# Altium PCB PCB1_AM.PcbDoc
Units mm, origin at the board's own origin, x right, y up, seen from the top; angles counter-clockwise.
Board outline 140 x 140 mm, 2 copper layers (Top Layer, Bottom Layer); 42 components, 25 nets, 98 pads, 0 vias.
Unrouted connection lines stored in the file: 3.
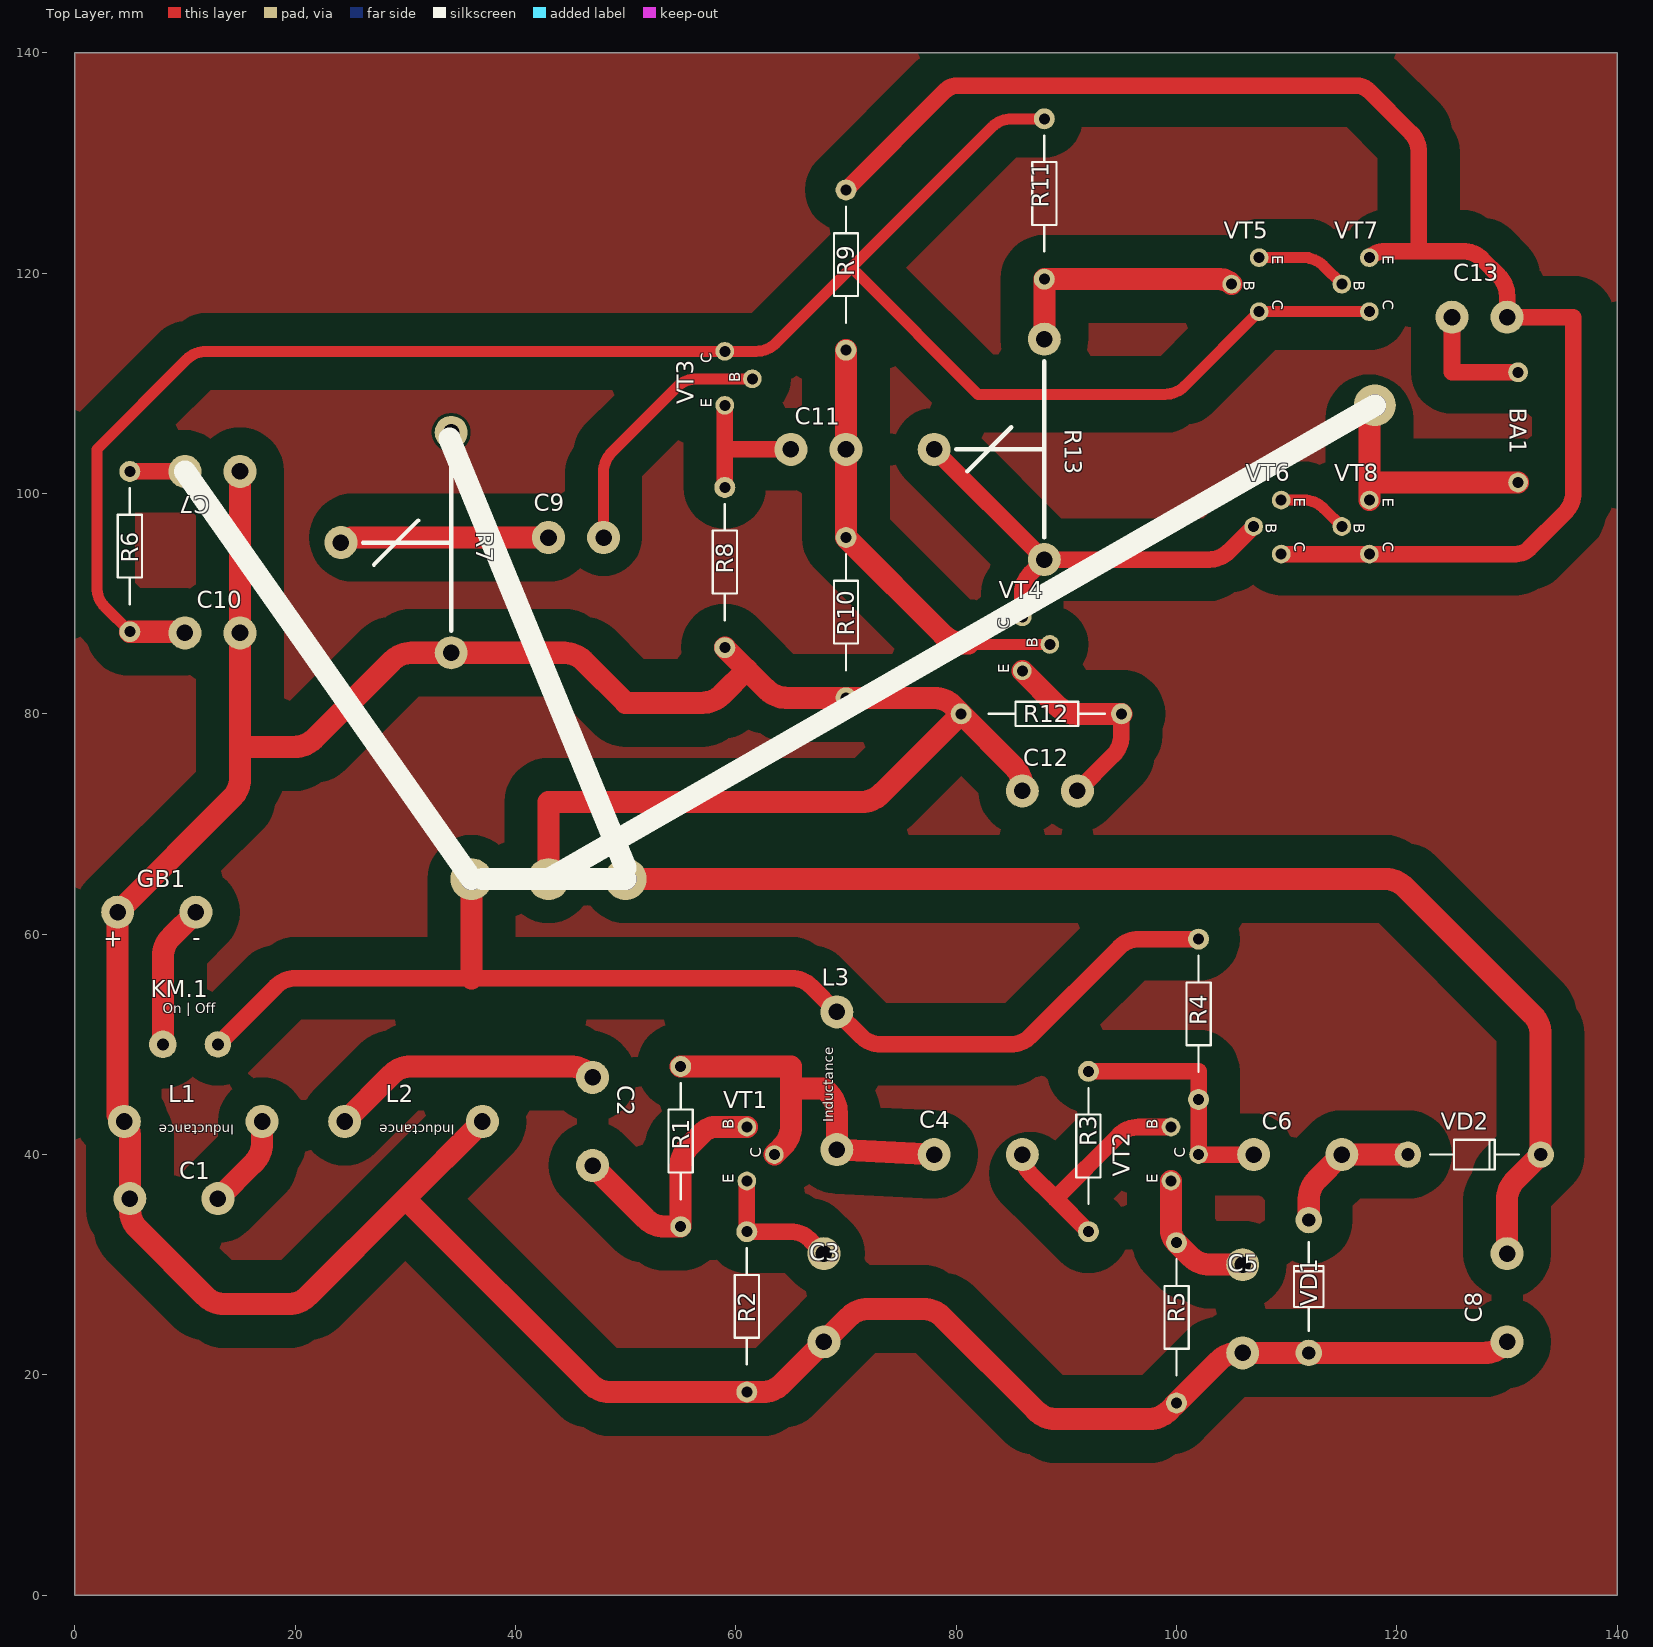
[diagram p0: Top Layer view]
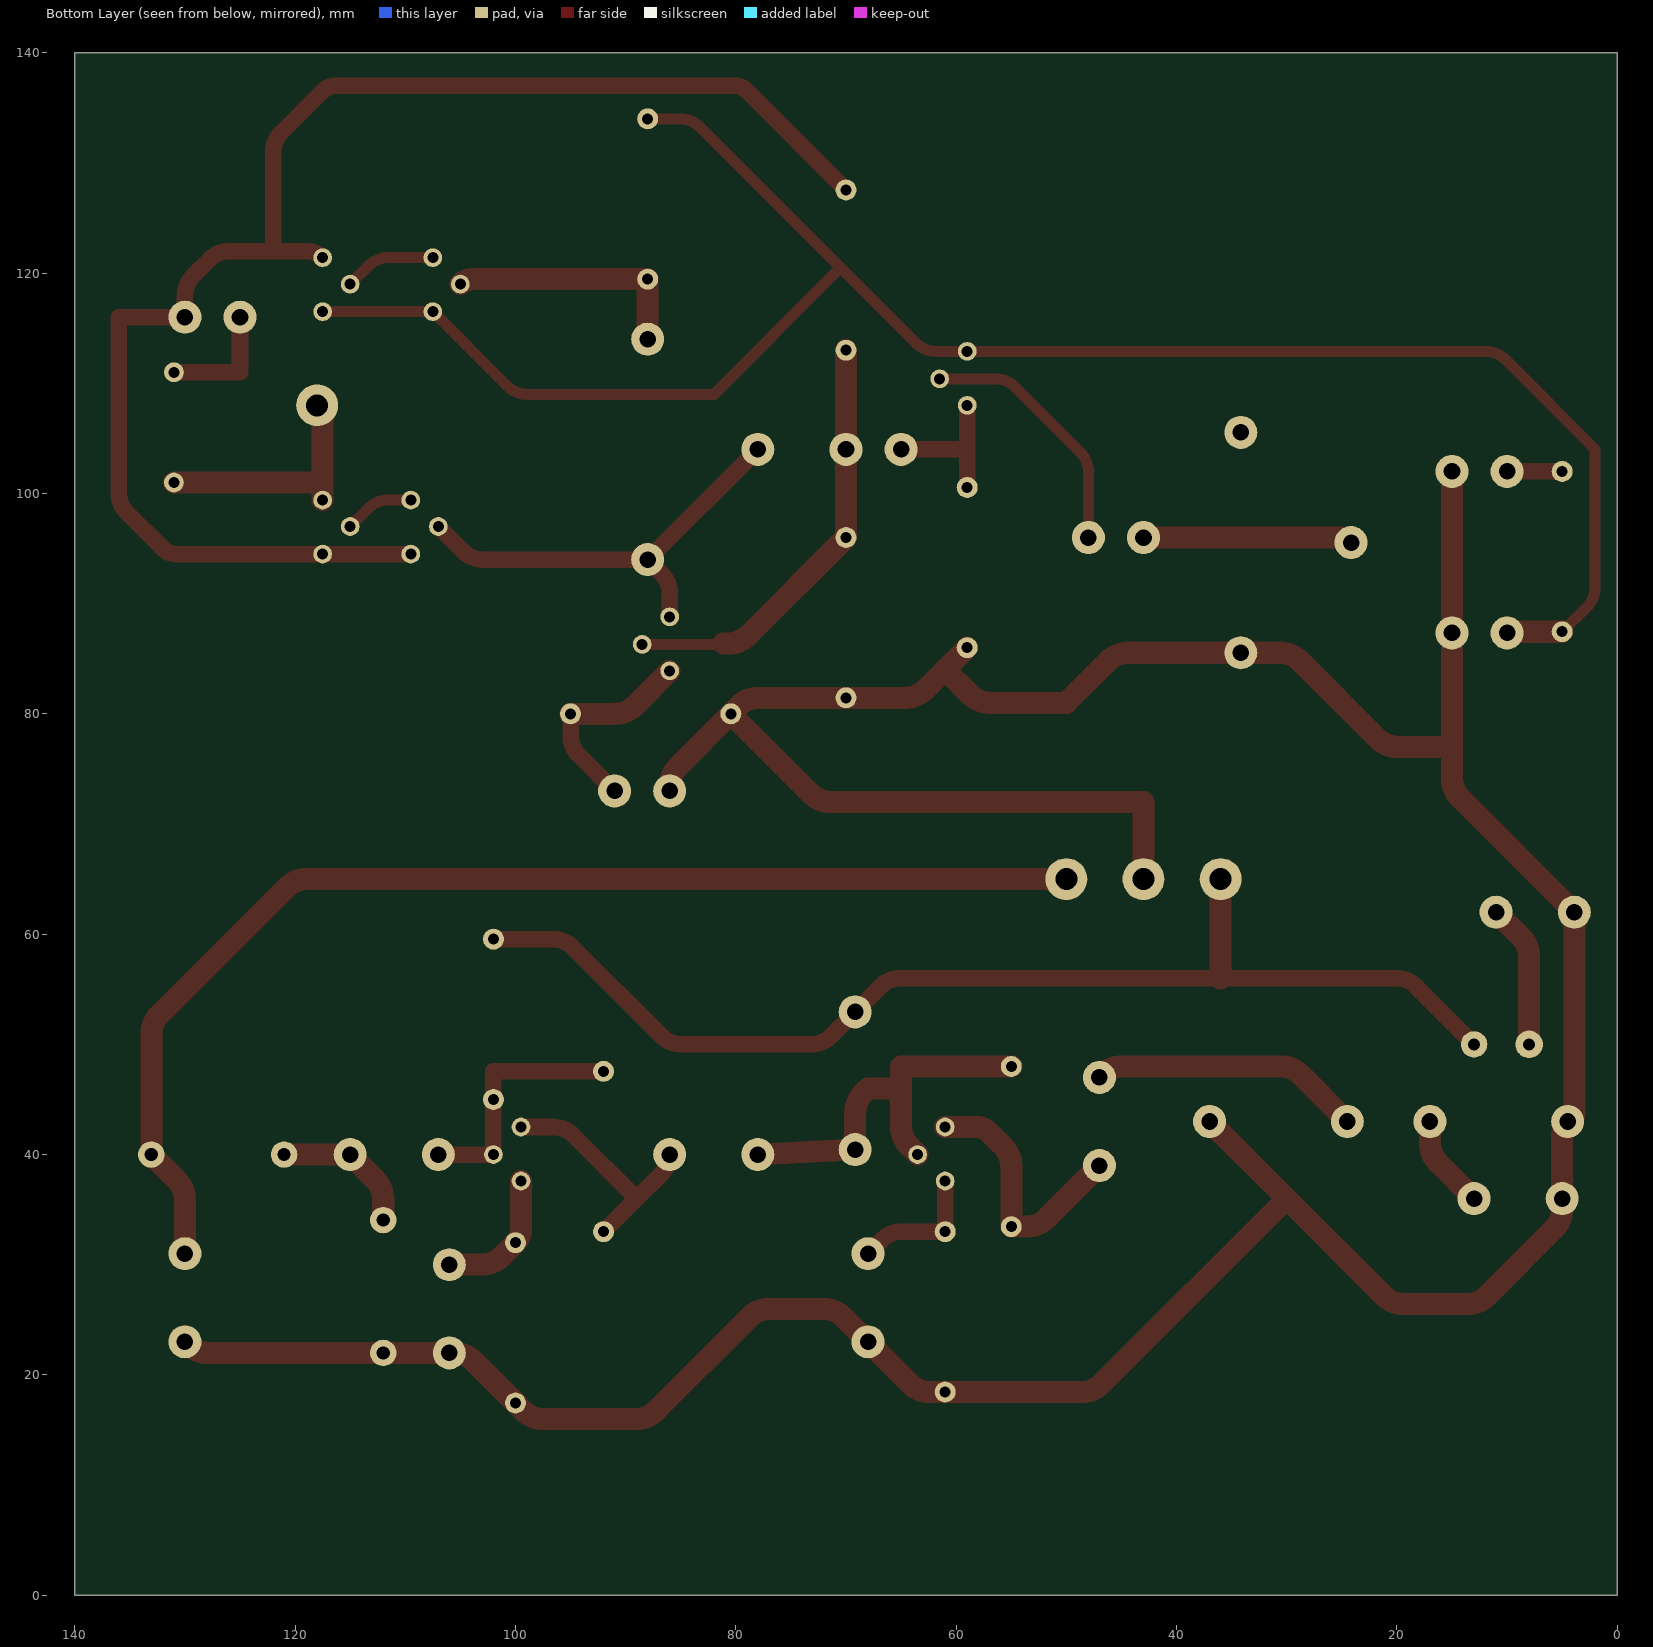
[diagram p1: Bottom Layer view, seen from below]

## Layer stack, top to bottom
Top Solder: solder mask 0.0102, Solder Resist, Dk 3.5
Top Layer: signal copper 0.0356
Dielectric 1: dielectric 0.32, FR-4, Dk 4.8
Bottom Layer: signal copper 0.0356
Bottom Solder: solder mask 0.0102, Solder Resist, Dk 3.5

## Board outline
0,0 140,0 140,140 0,140

## Design rules (kind name [scope] priority, off if disabled: settings)
Clearance Clearance_1 [InPolygon vs IsTrack] p1: gap=3 ignorepadtopadclearanceinfootprint=FALSE
Clearance [All] p2: gap=0.254 ignorepadtopadclearanceinfootprint=FALSE
PlaneClearance [All] p1: clearance=3
PolygonConnect [All] p1: connectstyle=Relief reliefconductorwidth=0.254 reliefentries=4 polygonreliefangle="90 Angle" airgapwidth=3
RoutingVias [All] p1: holewidth=0.711 width=1.27 viastyle="Through Hole" minholewidth=0.711 minwidth=1.27 maxholewidth=0.711 maxwidth=1.27
SolderMaskExpansion [All] p1: expansion=0.102 istentingtop=FALSE
SupplyNets "Schematic Supply Nets_1" [InNet('V_BAT')] p1: voltage=0.000
SupplyNets "Schematic Supply Nets" [InNet('GND')] p2: voltage=0.000
Width [All] p1: maxlimit=2.5 minlimit=0.5 preferedwidth=2
29 further rules are at their usual default settings.

## Components (designator, comment, footprint, x,y, rotation, side; value= is the part's Value field where it differs from the comment)
BA1 "Speaker" speaker 131,106 r270 top
C1 "CV" ANY_CONDENSER 13,36 r180 top
C2 "Capacitor" ANY_CONDENSER 47,47 r270 top
C3 "Capacitor" ANY_CONDENSER 68,23 r90 top
C4 "Capacitor" ANY_CONDENSER 78,40 r0 top
C5 "Capacitor" ANY_CONDENSER 106,22 r90 top
C6 "Capacitor" ANY_CONDENSER 107,40 r0 top
C7 "Cp" any_polar_condenser 15,102 r0 top
C8 "Capacitor" ANY_CONDENSER 130,23 r90 top
C9 "Cp" any_polar_condenser 43,96 r180 top
C10 "Cp" any_polar_condenser 15,87.339 r0 top
C11 "Cp" any_polar_condenser 70,104 r0 top
C12 "Cp" any_polar_condenser 86,73 r180 top
C13 "Cp" any_polar_condenser 125,116 r180 top
GB1 "BatteryBig" POWER 8.4,62 r180 top
KM.1 "Button" ANY_SWITCHER 10.5,50 r0 top
L1 "Inductor(with coil)" ANY_INDUCTOR 9.5,43 r180 top
L2 "Inductor(with coil)" ANY_INDUCTOR 29.5,43 r180 top
L3 "Inductor(with coil)" ANY_INDUCTOR 69.166,47.946 r90 top
R1 "R2W" MLT0.125 55,34.45 r90 top
R2 "R2W" MLT0.125 61,19.45 r90 top
R3 "R2W" MLT0.125 92,34 r90 top
R4 "R2W" MLT0.125 102,46 r90 top
R5 "R2W" MLT0.125 100,18.45 r90 top
R6 "R2W" MLT0.125 5,88.45 r90 top
R7 "RVariable" any_var_res 34.163,95.543 r270 top
R8 "R2W" MLT0.125 59,87 r90 top
R9 "R2W" MLT0.125 70,114 r90 top
R10 "R2W" MLT0.125 70,82.45 r90 top
R11 "R2W" MLT0.125 88,120.45 r90 top
R12 "R2W" MLT0.125 81.45,80 r0 top
R13 "RVariable" any_var_res 88,104 r270 top
VD1 "Diode" kd522b 112,22 r90 top
VD2 "Diode" kd522b 121,40 r0 top
VT1 "VTb(pnp)" KTU-3-4 61,37.7 r90 top
VT2 "VTb(pnp)" KTU-3-4 99.5,37.7 r90 top
VT3 "VTb(pnp)" KTU-3-6 59,108.1 r90 top
VT4 "VTb(pnp)" KTU-3-6 86,84 r90 top
VT5 "VTb(pnp)" KTU-3-6 107.5,121.3 r270 top
VT6 "VTb(npn)" KTU-3-6 109.5,99.3 r270 top
VT7 "VTb(pnp)" KTU-3-6 117.5,121.3 r270 top
VT8 "VTb(pnp)" KTU-3-6 117.5,99.3 r270 top

## Footprints (in the part's own frame and the unit in brackets; to place one, negate y for a bottom-side part, rotate by r counter-clockwise, add the part's x,y. Pads: shape width x height; smd on the part's side, far side on the other; paste and mask are expansions set on the pad)
ANY_CONDENSER [mm] "For different conditions"
  round 3 hole 1.5: 1(0,0) 2(8,0)
ANY_INDUCTOR [mm]
  round 3 hole 1.5: 1(-7.5,0) 2(5,0)
any_polar_condenser [mm]
  round 3 hole 1.5: 1(-5,0) 2(0,0)
ANY_SWITCHER [mm]
  round 2.5 hole 1.1: 1(-2.5,0)
  round 2.4 hole 1.1: 2(2.5,0)
any_var_res [mm]
  round 3 hole 1.5: 1(-10,0) 2(10,0) 3(0,-10)
  silkscreen extent -8,-8 8,0
kd522b [mm]
  round 2.4 hole 1.2: 1(0,0) 2(12.05,0)
  silkscreen extent 2,-1.35 10.05,1.35, body extent -0.46,-1.3 12.46,1.4, height 2.55
KTU-3-4 [mm]
  round 1.7 hole 1: 1(4.8,0) 2(-0.1,0) 3(2.3,-2.5)
KTU-3-6 [mm]
  round 1.7 hole 1: 1(2.3,-2.5) 2(-0.1,0) 3(4.8,0)
MLT0.125 [mm]
  round 1.9 hole 1: 1(-1,0) 2(13.55,0)
  silkscreen extent 1.5,-1.1 12.05,1.1, body extent -1.25,-1.1 13.8,1.09, height 3.1
POWER [mm]
  round 3 hole 1.5: 1(-2.6,0) 2(4.5,0)
speaker [mm]
  round 1.8 hole 1: 1(-5,0) 2(5,0)

## Free pads (board coordinates)
  round 3.8 hole 2: 0(36,65) 0(43,65) 0(50,65) 0(118,108)

## Nets (pads, with @x,y where several pads share a name; then routed paths per layer and width w, separated by ;. In a path a pad name is that pad's centre, name@x,y a point inside that pad or via, vN(x,y) a via of type N, cw(c..) or ccw(c..) an arc to the next point about the centre after c; other vN are vias at no path point)
GND: C7.1 KM.1.2 L3.2 pad.0@36,65 R4.2 R6.2 | length 111.4
  Top Layer w1.5: R6.2 C7.1 ; KM.1.2 18.256,55.256 cw(c20.052,53.46) 20.052,56 36,56 65.06,56 cw(c65.06,53.46) 66.856,55.256 L3.2 71.368,50.744 ccw(c73.164,52.54) 73.164,50 84.948,50 ccw(c84.948,52.54) 86.744,50.744 94.806,58.806 cw(c96.602,57.01) 96.602,59.55 R4.2
  Top Layer w2: 36,56 pad.0@36,65
NetBA1_1: BA1.1 C13.2 | length 11
  Top Layer w1.5: C13.2 125,111 BA1.1
NetC1_1: C1.1 L1.1 | length 8.5
  Top Layer w2: C1.1 16.256,39.256 ccw(c14.46,41.052) 17,41.052 L1.1
NetC2_1: C2.1 L2.2 | length 24.8
  Top Layer w2: L2.2 28.756,47.256 cw(c30.552,45.46) 30.552,48 44.948,48 cw(c44.948,45.46) 46.744,47.256 C2.1
NetC2_2: C2.2 R1.1 VT1.1 | length 23.6
  Top Layer w2: C2.2 51.806,34.194 ccw(c53.602,35.99) 53.602,33.45 R1.1 55,38.948 cw(c57.54,38.948) 55.744,40.744 57,42 cw(c58.207,40.793) 58.207,42.5 VT1.1
NetC3_2: C3.2 R2.2 VT1.2 | length 12.3
  Top Layer w1.5: VT1.2 R2.2 64.948,33 cw(c64.948,30.46) 66.744,32.256 C3.2
NetC4_1: C4.1 L3.1 R1.2 VT1.3 | length 36.3
  Top Layer w2: R1.2 65,48 65,46 ; VT1.3 64.256,40.756 ccw(c62.46,42.552) 65,42.552 65,46 ; C4.1 L3.1 69.166,43.782 ccw(c66.626,43.782) 68.422,45.578 68,46 65,46
NetC4_2: C4.2 R3.1 VT2.1 | length 22.5
  Top Layer w1.5: C4.2 ccw(c88.414,40) 86.707,38.293 89,36 ; R3.1 89,36 ; VT2.1 96.552,42.5 ccw(c96.552,39.96) 94.756,41.756 89,36
NetC5_2: C5.2 R5.2 VT2.2 | length 12.5
  Top Layer w2: VT2.2 99.5,33.207 ccw(c101.207,33.207) R5.2 101.256,30.744 ccw(c103.052,32.54) 103.052,30 C5.2
NetC6_1: C6.1 R3.2 R4.1 VT2.3 | length 22.5
  Top Layer w1.5: R3.2 102,47.55 R4.1 VT2.3 C6.1
NetC6_2: C6.2 VD1.2 VD2.1 | length 13.1
  Top Layer w2: VD1.2 112,35.948 cw(c114.54,35.948) 112.744,37.744 C6.2 VD2.1
NetC8_2: C8.2 pad.0@50,65 R7.1 VD2.2 | length 110.3
  Top Layer w2: pad.0@50,65 118.948,65 cw(c118.948,62.46) 120.744,64.256 132.306,52.694 cw(c130.51,50.898) 133.05,50.898 VD2.2 130.744,37.694 ccw(c132.54,35.898) 130,35.898 C8.2
NetC9_1: C9.1 VT3.1 | length 23.3
  Top Layer w1: C9.1 48,101.948 cw(c50.54,101.948) 48.744,103.744 54.656,109.656 cw(c56.452,107.86) 56.452,110.4 VT3.1
NetC9_2: C9.2 R7.3 | length 19
  Top Layer w2: R7.3 cw(c25.267,94.439) 25.267,96 C9.2
NetC10_1: C10.1 R6.1 R11.2 VT3.3 VT5.3 VT7.3 | length 174.9
  Top Layer w1: R6.1 2.744,89.706 cw(c4.54,91.502) 2,91.502 2,104 10.156,112.156 cw(c11.952,110.36) 11.952,112.9 VT3.3 61.848,112.9 ccw(c61.848,115.44) 63.644,113.644 83.256,133.256 cw(c85.052,131.46) 85.052,134 R11.2 ; 71,120 82,109 98.948,109 ccw(c98.948,111.54) 100.744,109.744 VT5.3 VT7.3
  Top Layer w2: R6.1 9.732,87.45 cw(c9.732,87.071) C10.1
NetC11_1: C11.1 R8.2 VT3.2 | length 13.4
  Top Layer w1.5: R8.2 59,104 ; VT3.2 59,104 ; C11.1 59,104
NetC11_2: C11.2 R9.1 R10.2 VT4.1 | length 39.4
  Top Layer w1: 81.102,86.385 ccw(c81.752,88.84) 81.752,86.3 VT4.1
  Top Layer w2: R9.1 C11.2 R10.2 78.871,87.129 ccw(c80.667,88.925) 80.667,86.385 81.102,86.385
NetC12_1: C12.1 R12.2 VT4.2 | length 19.1
  Top Layer w1.5: C12.1 94.256,76.256 ccw(c92.46,78.052) 95,78.052 R12.2
  Top Layer w2: VT4.2 89.156,80.744 ccw(c90.952,82.54) 90.952,80 R12.2
NetC13_1: C13.1 R9.2 VT6.3 VT7.2 VT8.3 | length 135.6
  Top Layer w1.5: R9.2 79.011,136.561 cw(c80.071,135.5) 79.013,136.563 cw(c80.071,135.5) 79.171,136.7 cw(c80.071,135.5) 80.071,137 116.379,137 cw(c116.379,135.5) 117.439,136.561 121.256,132.744 cw(c119.46,130.948) 122,130.948 122,122 ; VT6.3 VT8.3 130.793,94.5 ccw(c130.793,96.207) 132,95 135.256,98.256 ccw(c133.46,100.052) 136,100.052 136,116 C13.1 130,117.948 ccw(c127.46,117.948) 129.256,119.744 127.744,121.256 ccw(c125.948,119.46) 125.948,122 122,122 ; VT7.2 cw(c118.949,119.951) 118.949,122 122,122
NetGB1_1: GB1.1 KM.1.1 | length 13.1
  Top Layer w2: KM.1.1 8,57.948 cw(c10.54,57.948) 8.744,59.744 GB1.1
NetR11_1: R11.1 R13.1 VT5.1 | length 22.6
  Top Layer w2: R13.1 R11.1 103.914,119.45 cw(c103.914,117.914) VT5.1
NetR13_2: R13.2 R13.3 VT4.3 VT6.1 | length 40.2
  Top Layer w1.5: R13.3 R13.2 ; VT4.3 86,90.948 cw(c88.54,90.948) 86.744,92.744 R13.2 ; VT6.1 104.744,94.744 cw(c102.948,96.54) 102.948,94 R13.2
NetVT5_2: VT5.2 VT7.1 | length 8.4
  Top Layer w1: VT5.2 111.94,121.4 cw(c111.94,121.213) 112.073,121.345 cw(c111.548,118.86) 113.344,120.656 VT7.1
NetVT6_2: VT6.2 VT8.1 | length 6.4
  Top Layer w1: VT6.2 111.548,99.4 cw(c111.548,96.86) 113.344,98.656 VT8.1
V_BAT: BA1.2 C1.2 C3.1 C5.1 C7.2 C8.1 C10.2 C12.2 GB1.2 L1.2 L2.1 pad.0@43,65 pad.0@118,108 R2.1 R5.1 R7.2 R8.1 R10.1 R12.1 VD1.1 VT8.2 | length 386.3
  Top Layer w1: BA1.2 cw(c131.241,101) BA1.2@131.07,101.17
  Top Layer w2: C7.2 C10.2 15,77 ; L2.1 30,36 ; pad.0@43,65 43,72 71.398,72 ccw(c71.398,74.54) 73.194,72.744 R12.1 ; R8.1 61,84 ; C12.2 86,73.398 ccw(c83.46,73.398) 85.256,75.194 R12.1 ; VT8.2 117.5,101 ; pad.0@118,108 ccw(c119.207,106.793) 117.5,106.793 117.5,101 ; C8.1 129.744,22.744 cw(c127.948,24.54) 127.948,22 VD1.1 C5.1 105.602,22 ccw(c105.602,19.46) 103.806,21.256 R5.1 99.294,16.744 cw(c97.498,18.54) 97.498,16 89.052,16 cw(c89.052,18.54) 87.256,16.744 78.744,25.256 ccw(c76.948,23.46) 76.948,26 72.052,26 ccw(c72.052,23.46) 70.256,25.256 C3.1 64.194,19.194 cw(c62.398,20.99) 62.398,18.45 R2.1 48.602,18.45 cw(c48.602,20.99) 46.806,19.194 30,36 ; BA1.2 117.5,101 ; 15,77 19.948,77 ccw(c19.948,79.54) 21.744,77.744 28.799,84.799 cw(c30.595,83.003) 30.595,85.543 R7.2 44.405,85.543 cw(c44.405,83.003) 46.201,84.799 50,81 56.948,81 ccw(c56.948,83.54) 58.744,81.744 61,84 ; 15,77 15,74.152 cw(c12.46,74.152) 14.256,72.356 GB1.2 3.9,43.6 L1.2 cw(c3.293,41.793) 5,41.793 C1.2 5,35.052 ccw(c7.54,35.052) 5.744,33.256 11.831,27.169 ccw(c13.627,28.965) 13.627,26.425 19.373,26.425 ccw(c19.373,28.965) 21.169,27.169 30,36 ; 61,84 62.806,82.194 ccw(c64.602,83.99) 64.602,81.45 R10.1 77.948,81.45 cw(c77.948,78.91) 79.744,80.706 R12.1

## Polygon pours and split planes (outlines as drawn)
no net on Top Layer "NONET_L01_P000" (solid, pour order 0): 0,0 140,0 140,140 0,140

## Silkscreen, mask and mechanical layers (free items; w line width, h text height)
Top Overlay:
  lines w2: 10,102 36,65 ; 34,105 50,66 ; 37,65 50,65 ; 43,65 118,108

## Text inside footprints (layer, text, board x,y; h text height)
GB1: Top Overlay "-" at 11.446,60.108 h1.52 r180; Top Overlay "+" at 4.346,60.2 h1.52 r180
KM.1: Top Overlay "On | Off" at 8,52.5 h1.52
L1: Top Overlay "Inductance" at 14.5,43 h1.52 r180
L2: Top Overlay "Inductance" at 34.5,43 h1.52 r180
L3: Top Overlay "Inductance" at 69.166,42.946 h1.52 r90
VT1: Top Overlay "C" at 62.3,39.7 h1 r90; Top Overlay "B" at 59.8,42.3 h1 r90; Top Overlay "E" at 59.8,37.4 h1 r90
VT2: Top Overlay "C" at 100.8,39.7 h1 r90; Top Overlay "B" at 98.3,42.3 h1 r90; Top Overlay "E" at 98.3,37.4 h1 r90
VT3: Top Overlay "C" at 57.8,111.8 h1 r90; Top Overlay "B" at 60.4,110.1 h1 r90; Top Overlay "E" at 57.8,107.8 h1 r90
VT4: Top Overlay "C" at 84.8,87.7 h1 r90; Top Overlay "B" at 87.4,86 h1 r90; Top Overlay "E" at 84.8,83.7 h1 r90
VT5: Top Overlay "C" at 108.7,117.6 h1 r270; Top Overlay "B" at 106.1,119.3 h1 r270; Top Overlay "E" at 108.7,121.6 h1 r270
VT6: Top Overlay "C" at 110.7,95.6 h1 r270; Top Overlay "B" at 108.1,97.3 h1 r270; Top Overlay "E" at 110.7,99.6 h1 r270
VT7: Top Overlay "C" at 118.7,117.6 h1 r270; Top Overlay "B" at 116.1,119.3 h1 r270; Top Overlay "E" at 118.7,121.6 h1 r270
VT8: Top Overlay "C" at 118.7,95.6 h1 r270; Top Overlay "B" at 116.1,97.3 h1 r270; Top Overlay "E" at 118.7,99.6 h1 r270